# Altium PCB SydorenkoG12.PcbDoc
Units mil, origin at the board's own origin, x right, y up, seen from the top; angles counter-clockwise.
Board outline 4330.71 x 5511.81 mil, 2 copper layers (Top Layer, Bottom Layer); 73 components, 52 nets, 192 pads, 89 vias.
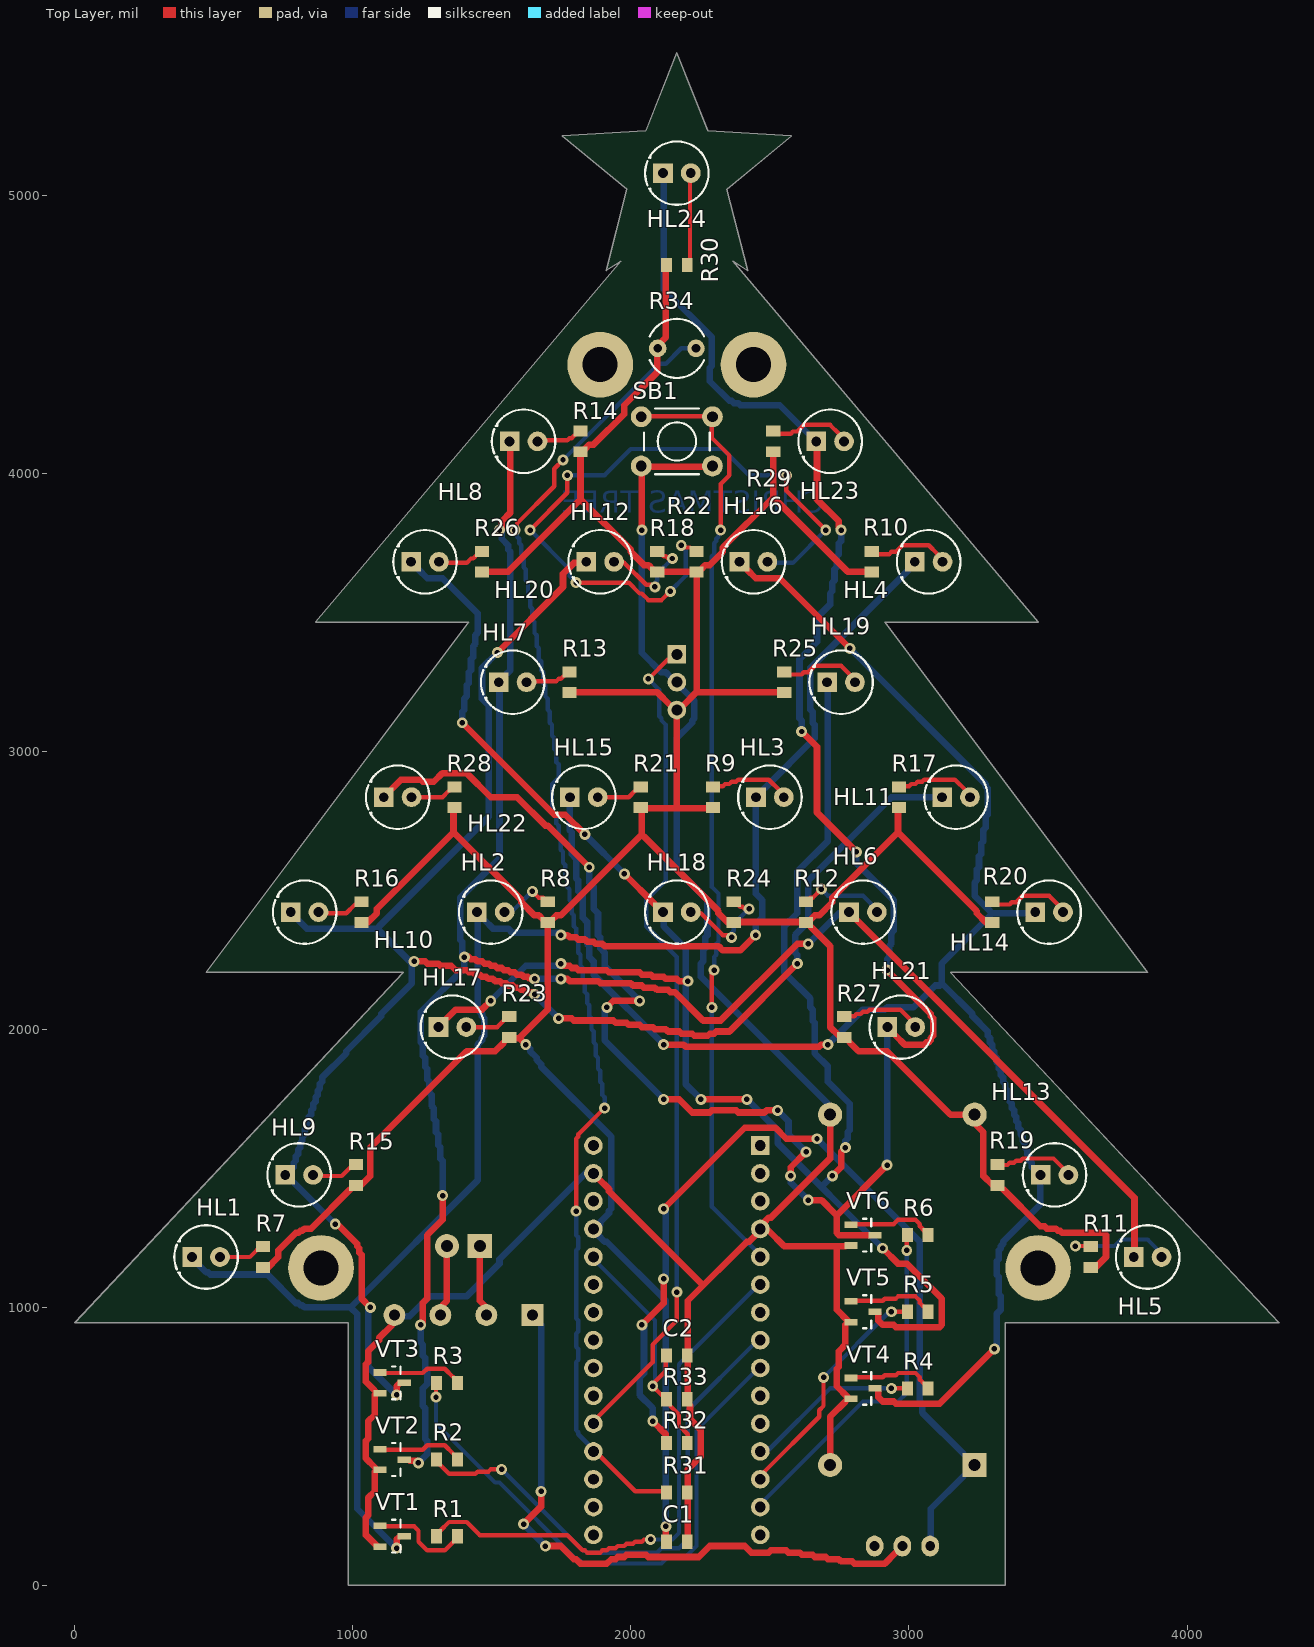
[diagram p0: Top Layer view]
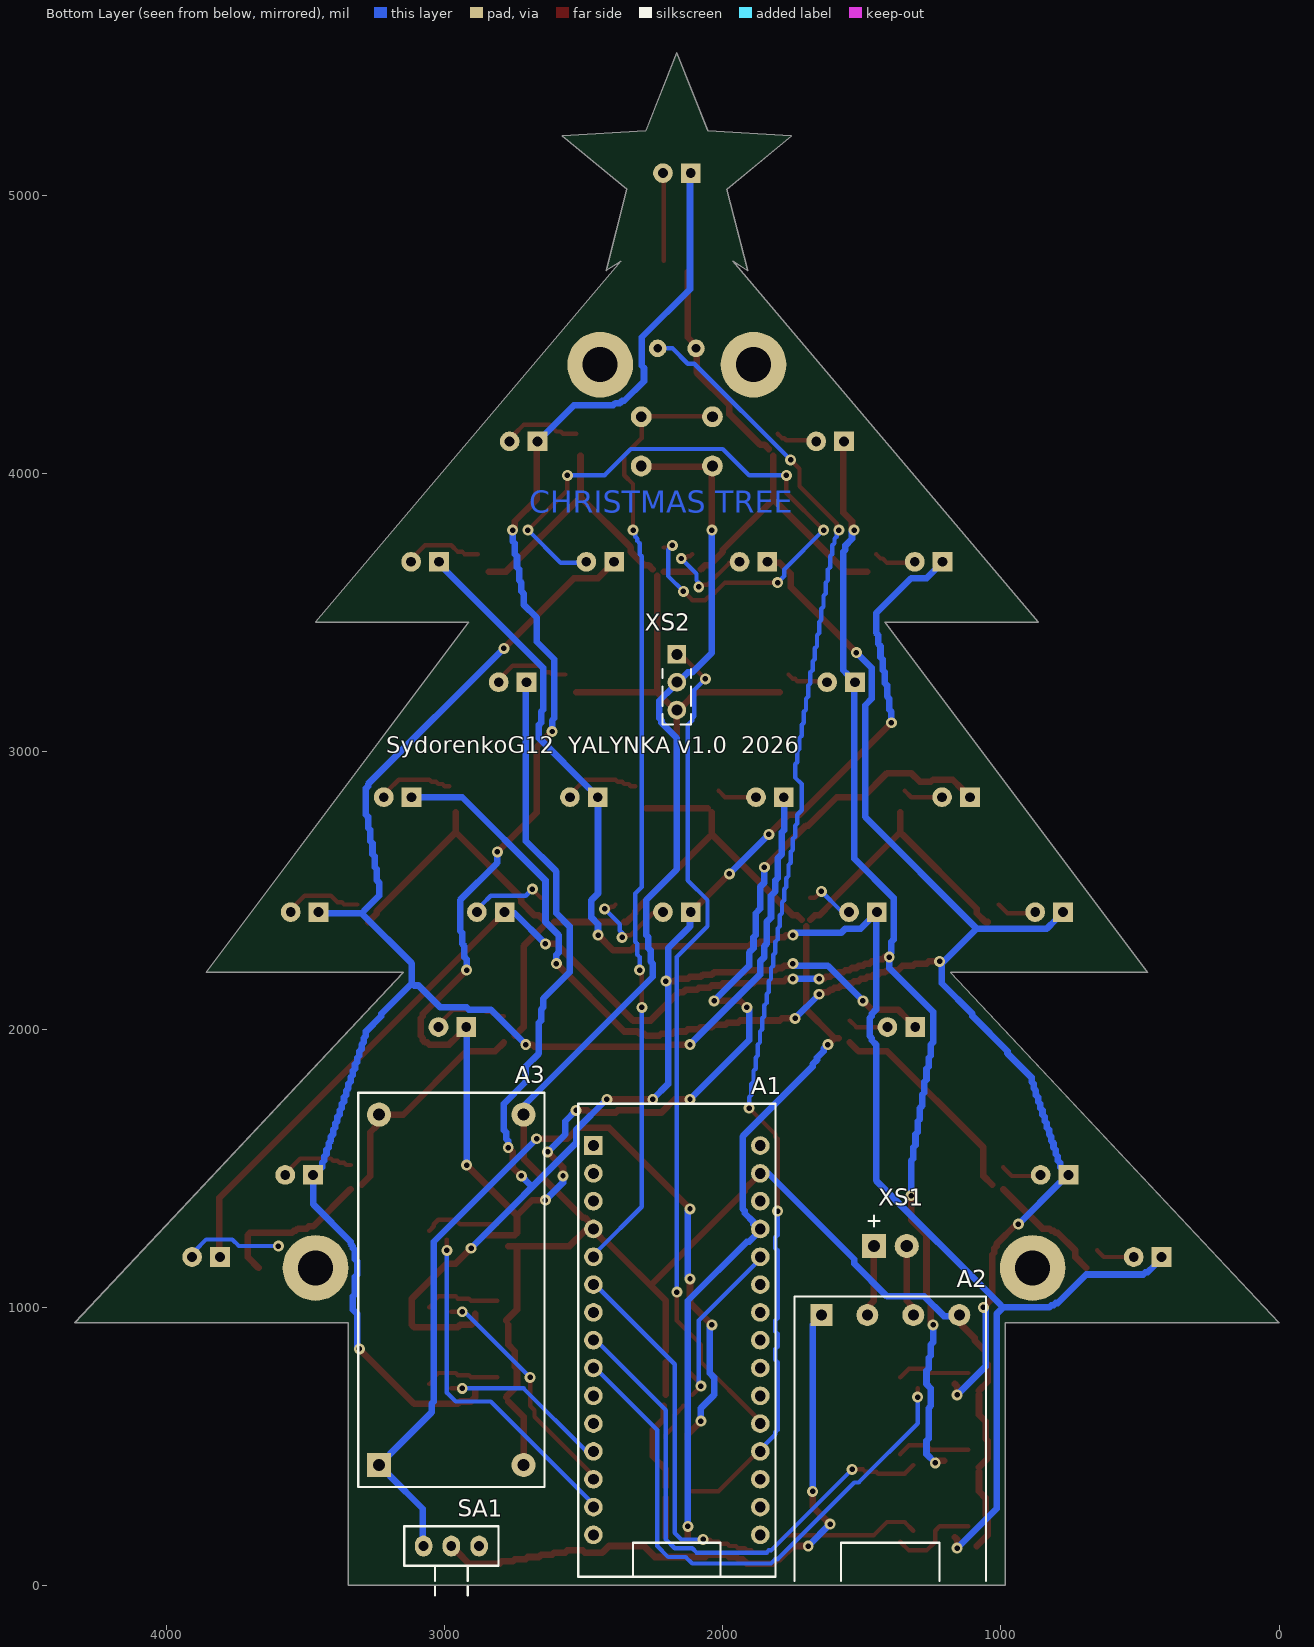
[diagram p1: Bottom Layer view, seen from below]

## Layer stack, top to bottom
Top Solder: solder mask 0.4, Solder Resist, Dk 3.5
Top Layer: signal copper 1.4
Dielectric 1: dielectric 12.6, FR-4, Dk 4.8
Bottom Layer: signal copper 1.4
Bottom Solder: solder mask 0.4, Solder Resist, Dk 3.5

## Board outline
0,944.88 984.25,944.88 984.25,0 3346.46,0 3346.46,944.88 4330.71,944.88 3149.61,2204.72 3858.27,2204.72 2913.39,3464.57 3464.57,3464.57 2366.57,4762.2 2419.92,4728.39 2345.08,5020.35 2577.24,5212.56 2276.42,5231.61 2165.35,5511.81 2054.29,5231.61 1753.46,5212.56 1985.63,5020.35 1910.79,4728.39 1964.13,4762.2 866.14,3464.57 1417.32,3464.57 472.44,2204.72 1181.1,2204.72

## Design rules (kind name [scope] priority, off if disabled: settings)
Clearance [All] p1: gap=10 ignorepadtopadclearanceinfootprint=FALSE
HoleSize [All] p1: absolutevalues=TRUE maxlimit=137.8 minlimit=0.98 maxpercent=80.000 minpercent=20.000
PolygonConnect [All] p1: connectstyle=Relief reliefconductorwidth=10 reliefentries=4 polygonreliefangle="90 Angle" airgapwidth=10
RoutingVias [All] p1: holewidth=19.68 width=39.37 viastyle="Through Hole" minholewidth=19.68 minwidth=39.37 maxholewidth=28 maxwidth=50
SolderMaskExpansion TentedVias [IsVia] p1: expansion=4 istentingtop=TRUE
SolderMaskExpansion [All] p2: expansion=4 istentingtop=FALSE
SupplyNets "Schematic Supply Nets_1" [InNet('+5V')] p1: voltage=0.000
SupplyNets "Schematic Supply Nets" [InNet('GND')] p2: voltage=0.000
Width [All] p1: maxlimit=40 minlimit=10 preferedwidth=16
29 further rules are at their usual default settings.

## Components (designator, comment, footprint, x,y, rotation, side; value= is the part's Value field where it differs from the comment)
A1 "Arduino Nano V3" ARDUINO_NANO 2165.35,881.89 r180 bottom
A2 "TP4056 Type-C" MOD_TP4056 1397.64,527.56 r180 bottom
A3 "MT3608 5V" MOD_MT3608 2976.38,1062.99 r180 bottom
C1 "10 мк" C_0805 2165.35,157.48 r0 top
C2 "100 н" C_0805 2165.35,826.77 r0 top
HL1 "LED 5mm" LED_5MM 472.44,1181.1 r0 top
HL2 "LED 5mm" LED_5MM 1496.06,2421.26 r0 top
HL3 "LED 5mm" LED_5MM 2500,2834.65 r0 top
HL4 "LED 5mm" LED_5MM 3070.87,3681.1 r0 top
HL5 "LED 5mm" LED_5MM 3858.27,1181.1 r0 top
HL6 "LED 5mm" LED_5MM 2834.65,2421.26 r0 top
HL7 "LED 5mm" LED_5MM 1574.8,3248.03 r0 top
HL8 "LED 5mm" LED_5MM 1614.17,4114.17 r0 top
HL9 "LED 5mm" LED_5MM 807.09,1476.38 r0 top
HL10 "LED 5mm" LED_5MM 826.77,2421.26 r0 top
HL11 "LED 5mm" LED_5MM 3169.29,2834.65 r0 top
HL12 "LED 5mm" LED_5MM 1889.76,3681.1 r0 top
HL13 "LED 5mm" LED_5MM 3523.62,1476.38 r0 top
HL14 "LED 5mm" LED_5MM 3503.94,2421.26 r0 top
HL15 "LED 5mm" LED_5MM 1830.71,2834.65 r0 top
HL16 "LED 5mm" LED_5MM 2440.94,3681.1 r0 top
HL17 "LED 5mm" LED_5MM 1358.27,2007.87 r0 top
HL18 "LED 5mm" LED_5MM 2165.35,2421.26 r0 top
HL19 "LED 5mm" LED_5MM 2755.91,3248.03 r0 top
HL20 "LED 5mm" LED_5MM 1259.84,3681.1 r0 top
HL21 "LED 5mm" LED_5MM 2972.44,2007.87 r0 top
HL22 "LED 5mm" LED_5MM 1161.42,2834.65 r0 top
HL23 "LED 5mm" LED_5MM 2716.54,4114.17 r0 top
HL24 "LED 5mm" LED_5MM 2165.35,5078.74 r0 top
R1 "1 к" R_0805 1338.58,177.17 r0 top
R2 "1 к" R_0805 1338.58,452.76 r0 top
R3 "1 к" R_0805 1338.58,728.35 r0 top
R4 "1 к" R_0805 3031.5,708.66 r0 top
R5 "1 к" R_0805 3031.5,984.25 r0 top
R6 "1 к" R_0805 3031.5,1259.84 r0 top
R7 "270" R_0805 677.17,1181.1 r90 top
R8 "270" R_0805 1700.79,2421.26 r90 top
R9 "270" R_0805 2295.28,2834.65 r90 top
R10 "270" R_0805 2866.14,3681.1 r90 top
R11 "270" R_0805 3653.54,1181.1 r90 top
R12 "270" R_0805 2629.92,2421.26 r90 top
R13 "270" R_0805 1779.53,3248.03 r90 top
R14 "270" R_0805 1818.9,4114.17 r90 top
R15 "180" R_0805 1011.81,1476.38 r90 top
R16 "180" R_0805 1031.5,2421.26 r90 top
R17 "180" R_0805 2964.57,2834.65 r90 top
R18 "180" R_0805 2094.49,3681.1 r90 top
R19 "180" R_0805 3318.9,1476.38 r90 top
R20 "180" R_0805 3299.21,2421.26 r90 top
R21 "180" R_0805 2035.43,2834.65 r90 top
R22 "180" R_0805 2236.22,3681.1 r90 top
R23 "180" R_0805 1562.99,2007.87 r90 top
R24 "180" R_0805 2370.08,2421.26 r90 top
R25 "180" R_0805 2551.18,3248.03 r90 top
R26 "180" R_0805 1464.57,3681.1 r90 top
R27 "180" R_0805 2767.72,2007.87 r90 top
R28 "180" R_0805 1366.14,2834.65 r90 top
R29 "180" R_0805 2511.81,4114.17 r90 top
R30 "180" R_0805 2165.35,4748.03 r0 top
R31 "10 к" R_0805 2165.35,334.65 r0 top
R32 "100 к" R_0805 2165.35,511.81 r0 top
R33 "100 к" R_0805 2165.35,669.29 r0 top
R34 "GL5528" LDR_5MM 2165.35,4448.82 r0 top
SA1 "SS12D00" SW_SLIDE_SPDT 2976.38,141.73 r180 bottom
SB1 "TS-6x6" TACT_6X6 2165.35,4114.17 r0 top
VT1 "BC817" SOT-23 1141.73,177.17 r270 top
VT2 "BC817" SOT-23 1141.73,452.76 r270 top
VT3 "BC817" SOT-23 1141.73,728.35 r270 top
VT4 "BC817" SOT-23 2834.65,708.66 r270 top
VT5 "BC817" SOT-23 2834.65,984.25 r270 top
VT6 "BC817" SOT-23 2834.65,1259.84 r270 top
XS1 "Li-ion 18650" BAT_PADS_2 1397.64,1220.47 r180 bottom
XS2 "MAX4466 / KY-038" PINHDR_1X3 2165.35,3248.03 r180 bottom

## Footprints (in the part's own frame and the unit in brackets; to place one, negate y for a bottom-side part, rotate by r counter-clockwise, add the part's x,y. Pads: shape width x height; smd on the part's side, far side on the other; paste and mask are expansions set on the pad)
ARDUINO_NANO [mm] "Arduino Nano V3 module, 2x15 THT 2.54mm, rows 15.24mm, USB at -Y"
  rect 1.7x1.7 hole 1: 1(-7.62,17.78)
  round 1.7 hole 1: 2(-7.62,15.24) 3(-7.62,12.7) 4(-7.62,10.16) 5(-7.62,7.62) 6(-7.62,5.08) 7(-7.62,2.54) 8(-7.62,0) 9(-7.62,-2.54) 10(-7.62,-5.08) 11(-7.62,-7.62) 12(-7.62,-10.16) 13(-7.62,-12.7) 14(-7.62,-15.24) 15(-7.62,-17.78) 16(7.62,-17.78) 17(7.62,-15.24) 18(7.62,-12.7) 19(7.62,-10.16) 20(7.62,-7.62) 21(7.62,-5.08) 22(7.62,-2.54) 23(7.62,0) 24(7.62,2.54) 25(7.62,5.08) 26(7.62,7.62) 27(7.62,10.16) 28(7.62,12.7) 29(7.62,15.24) 30(7.62,17.78)
  silkscreen extent -9,-21.6 9,21.6
BAT_PADS_2 [mm] "2 pads for battery wires, pad 1 = +"
  rect 2.2x2.2 hole 1.1: 1(-1.5,0)
  round 2.2 hole 1.1: 2(1.5,0)
  silkscreen extent -2,1.8 -1,2.8
C_0805 [mm] "Capacitor 0805 SMD"
  rect 1x1.3 smd: 1(-0.95,0) 2(0.95,0)
LDR_5MM [mm] "Photoresistor GL5528, 5mm"
  round 1.6 hole 0.8: 1(-1.75,0) 2(1.75,0)
  silkscreen extent -2.47,-2.7 2.47,2.7
LED_5MM [mm] "LED 5mm THT, pad 1 = K (square), pad 2 = A"
  rect 1.8x1.8 hole 0.9: 1(-1.27,0)
  round 1.8 hole 0.9: 2(1.27,0)
  silkscreen extent -2.9,-2.9 2.9,2.9
MOD_MT3608 [mm] "MT3608 boost module. 1=IN+ 2=IN- 3=OUT+ 4=OUT-"
  rect 2.2x2.2 hole 1.1: 1(-6.6,-16)
  round 2.2 hole 1.1: 2(6.6,-16) 3(-6.6,16) 4(6.6,16)
  silkscreen extent -8.5,-18 8.5,18
MOD_TP4056 [mm] "TP4056 Type-C charger module w/ protection. 1=OUT+ 2=B+ 3=B- 4=OUT-, USB at -Y"
  rect 2x2 hole 1: 1(-6.3,11.3)
  round 2 hole 1: 2(-2.1,11.3) 3(2.1,11.3) 4(6.3,11.3)
  silkscreen extent -8.75,-13 8.75,13
PINHDR_1X3 [mm] "Pin header 1x3 2.54mm"
  rect 1.7x1.7 hole 1: 1(0,2.54)
  round 1.7 hole 1: 2(0,0) 3(0,-2.54)
  silkscreen extent -1.3,-3.85 1.3,1.18
R_0805 [mm] "Resistor 0805 SMD"
  rect 1x1.3 smd: 1(-0.95,0) 2(0.95,0)
SOT-23 [mm] "SOT-23, 1=B 2=E 3=C (BC817)"
  rect 0.6x1.2 smd: 1(-0.95,-1.1) 2(0.95,-1.1) 3(0,1.1)
  silkscreen extent -1.5,0.01 1.5,0.75
SW_SLIDE_SPDT [mm] "Slide switch SPDT (SS12D00 type), 2.54mm, lever to -Y"
  oval 1.6x1.9 hole 0.9: 1(-2.54,0) 2(0,0) 3(2.54,0)
  silkscreen extent -4.3,-4.5 4.3,1.8
TACT_6X6 [mm] "Tactile switch 6x6 THT"
  round 1.9 hole 1: 1(-3.25,2.25) 1(3.25,2.25) 2(-3.25,-2.25) 2(3.25,-2.25)
  silkscreen extent -3,-3 3,3

## Part data
A1: library part "Arduino Nano", "Модуль мікроконтролера Arduino Nano V3 (ATmega328P, 16 МГц)"
A2: library part "TP4056 module", "Модуль заряду Li-ion TP4056 з USB Type-C та захистом DW01"
A3: library part "MT3608 module", "Підвищувальний DC-DC модуль MT3608, вихід налаштувати на 5,0 В"
C1: library part C_0805, "Конденсатор 0805 10 мкФ 16 В X5R"
C2: library part C_0805, "Конденсатор 0805 100 нФ 50 В X7R"
HL1 HL2 HL3 HL4: library part LED, "Світлодіод 5 мм, червоний"
HL5 HL6 HL7 HL8: library part LED, "Світлодіод 5 мм, жовтий"
HL9 HL10 HL11 HL12: library part LED, "Світлодіод 5 мм, зелений"
HL13 HL14 HL15 HL16: library part LED, "Світлодіод 5 мм, синій"
HL17 HL18 HL19 HL20: library part LED, "Світлодіод 5 мм, білий"
HL21 HL22 HL23 HL24: library part LED, "Світлодіод 5 мм, теплий білий"
R1 R2 R3 R4 R5 R6: library part R_0805, "Резистор 0805 1 кОм 5%"
R7 R8 R9 R10 R11 R12 R13 R14: library part R_0805, "Резистор 0805 270 Ом 5%"
R15 R16 R17 R18 R19 R20 R21 R22 R23 R24 R25 R26 R27 R28 R29 R30: library part R_0805, "Резистор 0805 180 Ом 5%"
R31: library part R_0805, "Резистор 0805 10 кОм 5%"
R32 R33: library part R_0805, "Резистор 0805 100 кОм 1%"
R34: library part Photoresistor, "Фоторезистор GL5528"
SA1: library part "Switch SPDT", "Перемикач живлення SS12D00"
SB1: library part Button, "Кнопка тактова 6x6 мм (режими)"
VT1 VT2 VT3 VT4 VT5 VT6: library part "VT npn SOT23", "Транзистор NPN BC817-40, SOT-23"
XS1: library part "Battery pads", "Контакти для акумулятора 18650 (тримач на дротах)"
XS2: library part "Mic header", "Роз'єм модуля мікрофона (OUT, GND, VCC)"

## Free pads (board coordinates)
  round 236.22 hole 125.98: MH(885.83,1141.73) MH(1889.76,4389.76) MH(2440.94,4389.76) MH(3464.57,1141.73)

## Via types
v1: diameter 39.37, hole 19.68, Top Layer to Bottom Layer, tented both sides, 89 vias

## Nets (pads, with @x,y where several pads share a name; then routed paths per layer and width w, separated by ;. In a path a pad name is that pad's centre, name@x,y a point inside that pad or via, vN(x,y) a via of type N, cw(c..) or ccw(c..) an arc to the next point about the centre after c; other vN are vias at no path point)
+5V: A1.27 A3.3 C1.1 R7.1 R8.1 R9.1 R10.1 R11.1 R12.1 R13.1 R14.1 R15.1 R16.1 R17.1 R18.1 R19.1 R20.1 R21.1 R22.1 R23.1 R24.1 R25.1 R26.1 R27.1 R28.1 R29.1 R30.1 R34.1 XS2.3 | length 12974.2
  Top Layer w23.62: R7.1@692.91,1141.73 732.28,1181.1 732.28,1204.72 795.28,1267.72 803.15,1267.72 811.02,1275.59 818.9,1275.59 826.77,1283.46 850.39,1283.46 R15.1@992.13,1425.2 ; R15.1@1031.5,1440.94 1062.99,1472.44 1062.99,1574.8 1409.45,1921.26 1511.81,1921.26 R23.1@1543.31,1952.76 ; R16.1@1047.24,2385.83 1055.12,2385.83 1086.61,2417.32 1086.61,2433.07 1354.33,2700.79 ; R28.1@1362.2,2779.53 1362.2,2708.66 1606.3,2464.57 1606.3,2456.69 1653.54,2409.45 1669.29,2409.45 R8.1@1685.04,2393.7 ; R26.1@1480.32,3645.67 1559.06,3645.67 1811.02,3897.64 ; R23.1@1582.68,1968.5 1598.43,1968.5 v1(1622.05,1944.88) ; 1606.3,1976.38 1700.79,2070.87 R8.1@1700.79,2370.08 ; R8.1@1716.54,2393.7 1732.28,2409.45 1748.03,2409.45 2039.37,2700.79 R21.1@2039.37,2779.53 ; R13.1@1795.28,3212.6 2094.49,3212.6 XS2.3@2141.73,3165.35 ; R14.1@1818.9,4062.99 1818.9,3905.51 2000,3724.41 2000,3716.54 2047.24,3669.29 2062.99,3669.29 R18.1@2078.74,3653.54 ; R14.1@1834.65,4086.61 1850.39,4102.36 1866.14,4102.36 1976.38,4212.6 1976.38,4244.09 2094.49,4362.2 R34.1@2094.49,4425.2 ; 2047.24,2692.91 2314.96,2425.2 2314.96,2417.32 2346.46,2385.83 R24.1@2354.33,2385.83 ; R21.1@2055.12,2795.28 R9.1@2275.59,2795.28 ; R18.1@2110.24,3645.67 R22.1@2212.6,3645.67 ; R34.1@2110.24,4472.44 2125.98,4488.19 R30.1@2125.98,4724.41 ; C1.1@2125.98,173.23 v1(2125.98,212.6) ; 2165.35,2803.15 XS2.3@2165.35,3118.11 ; XS2.3@2188.98,3165.35 2236.22,3212.6 R25.1@2527.56,3212.6 ; 2236.22,3220.47 R22.1@2236.22,3629.92 ; R22.1@2251.97,3653.54 2267.72,3669.29 2283.46,3669.29 2330.71,3716.54 2330.71,3732.28 2511.81,3913.39 R29.1@2511.81,4062.99 ; R24.1@2385.83,2385.83 R12.1@2606.3,2385.83 ; 2519.68,3905.51 2779.53,3645.67 R10.1@2842.52,3645.67 ; R12.1@2645.67,2370.08 2716.54,2299.21 2716.54,2007.87 R27.1@2748.03,1976.38 ; R12.1@2645.67,2393.7 2661.42,2409.45 2677.17,2409.45 2724.41,2456.69 2724.41,2472.44 2960.63,2708.66 R17.1@2960.63,2779.53 ; R27.1@2787.4,1952.76 2818.9,1921.26 2921.26,1921.26 3149.61,1692.91 A3.3@3196.85,1692.91 ; 2968.5,2700.79 3244.09,2425.2 3244.09,2417.32 R20.1@3275.59,2385.83 ; A3.3@3244.09,1653.54 3267.72,1629.92 3267.72,1472.44 R19.1@3299.21,1440.94 ; R19.1@3338.58,1425.2 3472.44,1291.34 3488.19,1291.34 3496.06,1283.46 3527.56,1283.46 3535.43,1275.59 3543.31,1275.59 3551.18,1267.72 3700.79,1267.72 3708.66,1259.84 3708.66,1181.1 R11.1@3669.29,1141.73
  Bottom Layer w23.62: v1(1622.05,1944.88) 1637.8,1929.13 1637.8,1921.26 1661.42,1897.64 1661.42,1889.76 1677.17,1874.02 1677.17,1866.14 1929.13,1614.17 1929.13,1354.33 1921.26,1346.46 1921.26,1338.58 1889.76,1307.09 A1.27@1889.76,1299.21 ; A1.27@1881.89,1259.84 1905.51,1236.22 1913.39,1236.22 2125.98,1023.62 v1(2125.98,212.6)
BAT+: A2.2 XS1.1 | length 179.8
  Top Layer w23.62: XS1.1@1456.69,1181.1 1456.69,1023.62 A2.2@1472.44,1007.87
BAT-: A2.3 XS1.2 | length 179.8
  Top Layer w23.62: A2.3@1322.83,1007.87 1338.58,1023.62 XS1.2@1338.58,1181.1
BTN: A1.5 SB1.1 | length 3294.5
  Top Layer w15.75: SB1.1@2070.87,4204.72 SB1.1@2259.84,4204.72 ; v1(2291.34,2078.74) 2291.34,2204.72 v1(2299.21,2212.6) ; SB1.1@2291.34,4173.23 2291.34,4125.98 2354.33,4062.99 2354.33,3992.13 2322.83,3960.63 v1(2322.83,3795.28)
  Bottom Layer w15.75: v1(2291.34,2078.74) 2291.34,1362.2 A1.5@2448.82,1204.72 ; v1(2299.21,2212.6) 2299.21,2259.84 2307.09,2267.72 2307.09,2307.09 2314.96,2314.96 2314.96,2488.19 2291.34,2511.81 2291.34,3700.79 2299.21,3708.66 2299.21,3748.03 2307.09,3755.91 2307.09,3763.78 2314.96,3771.65 2314.96,3779.53 2322.83,3787.4 v1(2322.83,3795.28)
GND: A1.4 A1.29 A2.4 A3.2 A3.4 C1.2 C2.2 R31.2 R33.2 SB1.2 VT1.2 VT2.2 VT3.2 VT4.2 VT5.2 VT6.2 XS2.2 | length 7663.4
  Top Layer w23.62: VT2.2@1078.74,409.45 1078.74,338.58 1055.12,314.96 1055.12,251.97 1047.24,244.09 1047.24,181.1 VT1.2@1086.61,141.73 ; VT2.2@1078.74,425.2 1047.24,456.69 1047.24,519.68 1055.12,527.56 1055.12,590.55 1078.74,614.17 VT3.2@1078.74,685.04 ; VT3.2@1078.74,700.79 1047.24,732.28 1047.24,795.28 1055.12,803.15 1055.12,842.52 1094.49,881.89 1094.49,889.76 A2.4@1141.73,937.01 ; A1.29@1881.89,1464.57 1921.26,1425.2 1921.26,1417.32 2251.97,1086.61 ; v1(2039.37,3795.28) SB1.2@2039.37,3992.13 ; SB1.2@2070.87,4023.62 SB1.2@2259.84,4023.62 ; C1.2@2204.72,173.23 R31.2@2204.72,314.96 ; R31.2@2204.72,354.33 2204.72,417.32 2251.97,464.57 2251.97,559.06 2212.6,598.43 R33.2@2212.6,645.67 ; R33.2@2204.72,685.04 C2.2@2204.72,803.15 ; C2.2@2204.72,842.52 2204.72,1023.62 2417.32,1236.22 2425.2,1236.22 A1.4@2448.82,1259.84 ; A1.4@2480.32,1307.09 2496.06,1322.83 2503.94,1322.83 2716.54,1535.43 A3.4@2716.54,1653.54 ; A1.4@2496.06,1275.59 2551.18,1220.47 VT6.2@2771.65,1220.47 ; A3.2@2716.54,472.44 2716.54,606.3 VT4.2@2771.65,661.42 ; 2740.16,1212.6 2740.16,992.13 VT5.2@2779.53,952.76 ; VT5.2@2771.65,937.01 2771.65,866.14 2748.03,842.52 2748.03,787.4 2740.16,779.53 2740.16,716.54 VT4.2@2779.53,677.17
  Bottom Layer w23.62: A2.4@1181.1,968.5 1204.72,968.5 1275.59,1039.37 1409.45,1039.37 1527.56,1157.48 1527.56,1173.23 A1.29@1834.65,1480.32 ; v1(2039.37,3795.28) 2039.37,3354.33 2110.24,3283.46 2125.98,3283.46 XS2.2@2141.73,3267.72 ; XS2.2@2181.1,3228.35 2228.35,3181.1 2228.35,3118.11 2220.47,3110.24 2220.47,3102.36 2165.35,3047.24 2165.35,2574.8 2275.59,2464.57 2275.59,2338.58 2267.72,2330.71 2267.72,2291.34 2259.84,2283.46 2259.84,2244.09 2251.97,2236.22 2251.97,2188.98 A3.4@2708.66,1732.28
LIGHT: A1.19 R31.1 R34.2 | length 4737.7
  Top Layer w15.75: v1(1582.68,3795.28) 1590.55,3803.15 1590.55,3818.9 1724.41,3952.76 1724.41,4015.75 v1(1755.91,4047.24) ; v1(1803.15,1346.46) 1803.15,1606.3 1811.02,1614.17 1811.02,1622.05 v1(1905.51,1716.54) ; A1.19@1889.76,464.57 2015.75,338.58 R31.1@2110.24,338.58
  Bottom Layer w15.75: v1(1582.68,3795.28) 1590.55,3787.4 1590.55,3771.65 1598.43,3763.78 1598.43,3748.03 1606.3,3740.16 1606.3,3708.66 1614.17,3700.79 1614.17,3661.42 1622.05,3653.54 1622.05,3614.17 1629.92,3606.3 1629.92,3566.93 1637.8,3559.06 1637.8,3519.68 1645.67,3511.81 1645.67,3472.44 1653.54,3464.57 1653.54,3425.2 1661.42,3417.32 1661.42,3377.95 1669.29,3370.08 1669.29,3330.71 1677.17,3322.83 1677.17,3291.34 1685.04,3283.46 1685.04,3244.09 1692.91,3236.22 1692.91,3196.85 1700.79,3188.98 1700.79,3149.61 1708.66,3141.73 1708.66,3102.36 1716.54,3094.49 1716.54,3055.12 1724.41,3047.24 1724.41,3007.87 1732.28,3000 1732.28,2960.63 1740.16,2952.76 1740.16,2905.51 1716.54,2881.89 1716.54,2787.4 1732.28,2771.65 1732.28,2740.16 1740.16,2732.28 1740.16,2692.91 1748.03,2685.04 1748.03,2645.67 1755.91,2637.8 1755.91,2598.43 1763.78,2590.55 1763.78,2551.18 1771.65,2543.31 1771.65,2511.81 1779.53,2503.94 1779.53,2464.57 1787.4,2456.69 1787.4,2417.32 1795.28,2409.45 1795.28,2370.08 1803.15,2362.2 1803.15,2322.83 1811.02,2314.96 1811.02,2275.59 1818.9,2267.72 1818.9,2228.35 1826.77,2220.47 1826.77,2181.1 1834.65,2173.23 1834.65,2133.86 1842.52,2125.98 1842.52,2094.49 1850.39,2086.61 1850.39,2047.24 1858.27,2039.37 1858.27,2000 1866.14,1992.13 1866.14,1952.76 1874.02,1944.88 1874.02,1905.51 1881.89,1897.64 1881.89,1858.27 1889.76,1850.39 1889.76,1811.02 1897.64,1803.15 1897.64,1763.78 1905.51,1755.91 v1(1905.51,1716.54) ; v1(1755.91,4047.24) 2102.36,4393.7 2125.98,4393.7 2181.1,4448.82 R34.2@2204.72,4448.82 ; v1(1803.15,1346.46) 1803.15,1259.84 1811.02,1251.97 1811.02,1212.6 1803.15,1204.72 1803.15,960.63 1811.02,952.76 1811.02,913.39 1803.15,905.51 1803.15,858.27 1811.02,850.39 1811.02,811.02 1803.15,803.15 1803.15,559.06 1811.02,551.18 1811.02,543.31 A1.19@1850.39,503.94
MIC: A1.20 XS2.1 | length 2972.3
  Top Layer w15.75: A1.20@1881.89,606.3 2078.74,803.15 2078.74,866.14 2165.35,952.76 v1(2165.35,1055.12) ; v1(2062.99,3259.84) XS2.1@2133.86,3330.71
  Bottom Layer w15.75: v1(2062.99,3259.84) 2102.36,3220.47 2102.36,3125.98 2110.24,3118.11 2110.24,3110.24 2125.98,3094.49 2125.98,2535.43 2055.12,2464.57 2055.12,2370.08 2165.35,2259.84 v1(2165.35,1055.12)
NetHL1_1: HL1.1 HL2.1 HL3.1 HL4.1 VT1.3 | length 5718.6
  Top Layer w23.62: v1(1157.48,133.86) 1157.48,165.35 VT1.3@1165.35,173.23 ; v1(1748.03,2338.58) 1771.65,2338.58 1779.53,2330.71 1803.15,2330.71 1811.02,2322.83 1834.65,2322.83 1842.52,2314.96 1866.14,2314.96 1874.02,2307.09 1897.64,2307.09 1905.51,2299.21 2314.96,2299.21 2330.71,2283.46 2393.7,2283.46 v1(2448.82,2338.58)
  Bottom Layer w23.62: HL1.1@448.82,1149.61 472.44,1125.98 480.31,1125.98 488.19,1118.11 692.91,1118.11 795.28,1015.75 803.15,1015.75 811.02,1007.87 818.9,1007.87 826.77,1000 992.13,1000 1015.75,976.38 1015.75,275.59 v1(1157.48,133.86) ; 1000,1007.87 1448.82,1456.69 1448.82,1944.88 1464.57,1960.63 1464.57,1968.5 1472.44,1976.38 1472.44,2039.37 1464.57,2047.24 1464.57,2055.12 1448.82,2070.87 HL2.1@1448.82,2393.7 ; HL2.1@1472.44,2393.7 1503.94,2362.2 1559.06,2362.2 1574.8,2346.46 1740.16,2346.46 v1(1748.03,2338.58) ; v1(2448.82,2338.58) 2448.82,2377.95 2472.44,2401.57 2472.44,2464.57 2448.82,2488.19 HL3.1@2448.82,2803.15 ; HL3.1@2480.32,2866.14 2661.42,3047.24 2661.42,3094.49 2653.54,3102.36 2653.54,3141.73 2645.67,3149.61 2645.67,3299.21 HL4.1@3000,3653.54
NetHL1_2: HL1.2 R7.2 | length 112.1
  Top Layer w15.75: HL1.2@551.18,1181.1 629.92,1181.1 R7.2@653.54,1204.72
NetHL2_2: HL2.2 R8.2 | length 149.4
  Top Layer w15.75: v1(1645.67,2496.06) 1669.29,2472.44 R8.2@1685.04,2472.44
  Bottom Layer w15.75: HL2.2@1574.8,2425.2 v1(1645.67,2496.06)
NetHL3_2: HL3.2 R9.2 | length 246.6
  Top Layer w15.75: R9.2@2314.96,2874.02 2330.71,2874.02 2338.58,2881.89 2354.33,2881.89 2362.2,2889.76 2377.95,2889.76 2385.83,2897.64 2496.06,2897.64 HL3.2@2535.43,2858.27
NetHL4_2: HL4.2 R10.2 | length 246.6
  Top Layer w15.75: R10.2@2881.89,3708.66 2929.13,3708.66 2937.01,3716.54 2952.76,3716.54 2976.38,3740.16 3070.87,3740.16 HL4.2@3102.36,3708.66
NetHL5_1: HL5.1 HL6.1 HL7.1 HL8.1 VT2.3 | length 7100.1
  Top Layer w23.62: VT2.3@1204.72,448.82 1228.35,448.82 v1(1236.22,440.94) ; v1(1244.09,937.01) 1251.97,944.88 1251.97,1015.75 1267.72,1031.5 1267.72,1259.84 1322.83,1314.96 v1(1322.83,1401.57) ; v1(1401.57,2259.84) 1417.32,2259.84 1425.2,2251.97 1440.94,2251.97 1448.82,2244.09 1464.57,2244.09 1472.44,2236.22 1488.19,2236.22 1496.06,2228.35 1511.81,2228.35 1519.68,2220.47 1535.43,2220.47 1543.31,2212.6 1559.06,2212.6 1566.93,2204.72 1582.68,2204.72 1590.55,2196.85 1606.3,2196.85 1614.17,2188.98 1629.92,2188.98 1637.8,2181.1 v1(1653.54,2181.1) ; v1(1527.56,3795.28) 1535.43,3803.15 1535.43,3826.77 1566.93,3858.27 HL8.1@1566.93,4086.61 ; v1(1748.03,2181.1) 1771.65,2181.1 1779.53,2173.23 1881.89,2173.23 1889.76,2165.35 2000,2165.35 2007.87,2157.48 2039.37,2157.48 2047.24,2149.61 2086.61,2149.61 2094.49,2141.73 2133.86,2141.73 2141.73,2133.86 2157.48,2133.86 2259.84,2031.5 2322.83,2031.5 2598.43,2307.09 v1(2637.8,2307.09) ; HL6.1@2811.02,2393.7 3811.02,1393.7 HL5.1@3811.02,1212.6
  Bottom Layer w23.62: v1(1236.22,440.94) 1267.72,472.44 1267.72,519.68 1259.84,527.56 1259.84,637.8 1251.97,645.67 1251.97,708.66 1267.72,724.41 1267.72,771.65 1259.84,779.53 1259.84,818.9 1251.97,826.77 1251.97,866.14 1244.09,874.02 v1(1244.09,937.01) ; v1(1322.83,1401.57) 1322.83,1527.56 1314.96,1535.43 1314.96,1574.8 1307.09,1582.68 1307.09,1622.05 1299.21,1629.92 1299.21,1669.29 1291.34,1677.17 1291.34,1716.54 1283.46,1724.41 1283.46,1763.78 1275.59,1771.65 1275.59,1811.02 1267.72,1818.9 1267.72,1858.27 1259.84,1866.14 1259.84,1897.64 1251.97,1905.51 1251.97,1944.88 1244.09,1952.76 1244.09,2062.99 1401.57,2220.47 1401.57,2267.72 1393.7,2275.59 1393.7,2314.96 1385.83,2322.83 1385.83,2472.44 1527.56,2614.17 HL7.1@1527.56,3220.47 ; v1(1527.56,3795.28) 1535.43,3787.4 1535.43,3763.78 1559.06,3740.16 1559.06,3724.41 1566.93,3716.54 1566.93,3291.34 HL7.1@1551.18,3275.59 ; v1(1653.54,2181.1) v1(1748.03,2181.1) ; v1(2637.8,2307.09) 2748.03,2417.32 HL6.1@2755.91,2417.32
NetHL5_2: HL5.2 R11.2 | length 356.8
  Top Layer w15.75: v1(3598.43,1220.47) R11.2@3629.92,1220.47
  Bottom Layer w15.75: v1(3598.43,1220.47) 3740.16,1220.47 3763.78,1244.09 3858.27,1244.09 HL5.2@3897.64,1204.72
NetHL6_2: HL6.2 R12.2 | length 256.3
  Top Layer w15.75: R12.2@2645.67,2472.44 2653.54,2472.44 v1(2685.04,2503.94)
  Bottom Layer w15.75: v1(2685.04,2503.94) 2708.66,2480.32 2834.65,2480.32 HL6.2@2866.14,2448.82
NetHL7_2: HL7.2 R13.2 | length 120
  Top Layer w15.75: HL7.2@1653.54,3251.97 1732.28,3251.97 1740.16,3259.84 1748.03,3259.84 R13.2@1763.78,3275.59
NetHL8_2: HL8.2 R14.2 | length 120
  Top Layer w15.75: HL8.2@1692.91,4118.11 1771.65,4118.11 1779.53,4125.98 1787.4,4125.98 R14.2@1803.15,4141.73
NetHL9_1: HL9.1 HL10.1 HL11.1 HL12.1 VT3.3 | length 6477.9
  Top Layer w23.62: v1(937.01,1299.21) 944.88,1299.21 1015.75,1228.35 1015.75,1220.47 1023.62,1212.6 1023.62,1196.85 1031.5,1188.98 1031.5,1031.5 v1(1062.99,1000) ; v1(1157.48,685.04) 1157.48,716.54 VT3.3@1165.35,724.41 ; v1(1220.47,2244.09) 1259.84,2244.09 1267.72,2236.22 1307.09,2236.22 1314.96,2228.35 1354.33,2228.35 1370.08,2212.6 1409.45,2212.6 1417.32,2204.72 1433.07,2204.72 1440.94,2196.85 1456.69,2196.85 1464.57,2188.98 1480.32,2188.98 1488.19,2181.1 1503.94,2181.1 1511.81,2173.23 1527.56,2173.23 1535.43,2165.35 1551.18,2165.35 1559.06,2157.48 1574.8,2157.48 1582.68,2149.61 1598.43,2149.61 1606.3,2141.73 1614.17,2141.73 1622.05,2133.86 1645.67,2133.86 v1(1653.54,2125.98) ; v1(1519.68,3354.33) 1755.91,3590.55 1755.91,3637.8 1795.28,3677.17 HL12.1@1811.02,3677.17 ; v1(1740.16,2039.37) 1787.4,2039.37 1795.28,2031.5 1937.01,2031.5 1944.88,2023.62 1984.25,2023.62 1992.13,2015.75 2031.5,2015.75 2039.37,2007.87 2078.74,2007.87 2086.61,2000 2125.98,2000 2133.86,1992.13 2173.23,1992.13 2181.1,1984.25 2220.47,1984.25 2228.35,1976.38 2275.59,1976.38 2283.46,1984.25 2299.21,1984.25 2307.09,1992.13 2354.33,1992.13 v1(2598.43,2236.22)
  Bottom Layer w23.62: HL9.1@787.4,1448.82 v1(937.01,1299.21) ; HL9.1@787.4,1503.94 787.4,1519.68 795.28,1527.56 795.28,1543.31 803.15,1551.18 803.15,1566.93 811.02,1574.8 811.02,1590.55 818.9,1598.43 818.9,1614.17 826.77,1622.05 826.77,1637.8 834.65,1645.67 834.65,1661.42 842.52,1669.29 842.52,1685.04 850.39,1692.91 850.39,1708.66 858.27,1716.54 858.27,1732.28 866.14,1740.16 866.14,1755.91 874.02,1763.78 874.02,1779.53 881.89,1787.4 881.89,1803.15 889.76,1811.02 889.76,1826.77 976.38,1913.39 976.38,1921.26 1102.36,2047.24 1102.36,2055.12 1212.6,2165.35 1212.6,2236.22 1086.61,2362.2 834.65,2362.2 HL10.1@803.15,2393.7 ; v1(1062.99,1000) 1055.12,992.13 1055.12,787.4 v1(1157.48,685.04) ; 1094.49,2370.08 1488.19,2763.78 1488.19,3165.35 1464.57,3188.98 1464.57,3299.21 v1(1519.68,3354.33) ; v1(1653.54,2125.98) v1(1740.16,2039.37) ; v1(2598.43,2236.22) 2598.43,2267.72 2590.55,2275.59 2590.55,2338.58 2637.8,2385.83 2637.8,2535.43 2937.01,2834.65 HL11.1@3086.61,2834.65
NetHL9_2: HL9.2 R15.2 | length 115.4
  Top Layer w15.75: HL9.2@889.76,1472.44 960.63,1472.44 R15.2@992.13,1503.94
NetHL10_2: HL10.2 R16.2 | length 115.4
  Top Layer w15.75: HL10.2@905.51,2417.32 976.38,2417.32 R16.2@1007.87,2448.82
NetHL11_2: HL11.2 R17.2 | length 246.6
  Top Layer w15.75: R17.2@2984.25,2874.02 3000,2874.02 3007.87,2881.89 3023.62,2881.89 3031.5,2889.76 3047.24,2889.76 3055.12,2897.64 3165.35,2897.64 HL11.2@3204.72,2858.27
NetHL12_2: HL12.2 R18.2 | length 328.3
  Top Layer w15.75: HL12.2@1968.5,3677.17 1976.38,3677.17 2055.12,3598.43 2078.74,3598.43 v1(2086.61,3590.55) ; R18.2@2110.24,3708.66 2118.11,3700.79 2125.98,3700.79 2133.86,3692.91 v1(2149.61,3692.91)
  Bottom Layer w15.75: v1(2086.61,3590.55) 2086.61,3606.3 2094.49,3614.17 2094.49,3637.8 v1(2149.61,3692.91)
NetHL13_1: HL13.1 HL14.1 HL15.1 HL16.1 VT4.3 | length 6225.8
  Top Layer w23.62: v1(2118.11,1944.88) 2188.98,1944.88 2196.85,1937.01 2677.17,1937.01 2685.04,1944.88 v1(2708.66,1944.88) ; HL16.1@2417.32,3653.54 2448.82,3622.05 2535.43,3622.05 v1(2787.4,3370.08) ; VT4.3@2889.76,700.79 2889.76,677.17 2905.51,661.42 2944.88,661.42 2952.76,653.54 3110.24,653.54 v1(3307.09,850.39)
  Bottom Layer w23.62: HL15.1@1779.53,2803.15 1779.53,2716.54 1787.4,2708.66 1787.4,2629.92 1803.15,2614.17 1803.15,2543.31 1811.02,2535.43 1811.02,2496.06 1826.77,2480.32 1826.77,2401.57 1842.52,2385.83 1842.52,2307.09 1850.39,2299.21 1850.39,2259.84 1866.14,2244.09 1866.14,2196.85 v1(2118.11,1944.88) ; v1(2708.66,1944.88) 2834.65,2070.87 2913.39,2070.87 2921.26,2078.74 3015.75,2078.74 3094.49,2157.48 3110.24,2157.48 ; v1(2787.4,3370.08) 3275.59,2881.89 3275.59,2874.02 3283.46,2866.14 3283.46,2771.65 3275.59,2763.78 3275.59,2724.41 3267.72,2716.54 3267.72,2677.17 3259.84,2669.29 3259.84,2629.92 3251.97,2622.05 3251.97,2582.68 3244.09,2574.8 3244.09,2535.43 3236.22,2527.56 3236.22,2480.32 3291.34,2425.2 ; v1(3307.09,850.39) 3314.96,858.27 3314.96,976.38 3330.71,992.13 3330.71,1039.37 3322.83,1047.24 3322.83,1110.24 3314.96,1118.11 3314.96,1165.35 3322.83,1173.23 3322.83,1204.72 3330.71,1212.6 3330.71,1220.47 3338.58,1228.35 3338.58,1236.22 3472.44,1370.08 HL13.1@3472.44,1448.82 ; HL14.1@3425.2,2417.32 3299.21,2417.32 3118.11,2236.22 3118.11,2165.35 3228.35,2055.12 3228.35,2047.24 3283.46,1992.13 3283.46,1976.38 3291.34,1968.5 3291.34,1952.76 3299.21,1944.88 3299.21,1929.13 3307.09,1921.26 3307.09,1905.51 3314.96,1897.64 3314.96,1881.89 3322.83,1874.02 3322.83,1858.27 3330.71,1850.39 3330.71,1834.65 3338.58,1826.77 3338.58,1811.02 3346.46,1803.15 3346.46,1787.4 3354.33,1779.53 3354.33,1763.78 3362.2,1755.91 3362.2,1740.16 3370.08,1732.28 3370.08,1716.54 3377.95,1708.66 3377.95,1692.91 3385.83,1685.04 3385.83,1669.29 3393.7,1661.42 3393.7,1645.67 3401.57,1637.8 3401.57,1622.05 3409.45,1614.17 3409.45,1598.43 3417.32,1590.55 3417.32,1574.8 3425.2,1566.93 3425.2,1551.18 3433.07,1543.31 3433.07,1527.56 3440.94,1519.68 HL13.1@3440.94,1503.94
NetHL13_2: HL13.2 R19.2 | length 246.6
  Top Layer w15.75: R19.2@3338.58,1511.81 3354.33,1511.81 3362.2,1519.68 3377.95,1519.68 3385.83,1527.56 3401.57,1527.56 3409.45,1535.43 3519.68,1535.43 HL13.2@3559.06,1496.06
NetHL14_2: HL14.2 R20.2 | length 246.6
  Top Layer w15.75: R20.2@3314.96,2448.82 3362.2,2448.82 3370.08,2456.69 3385.83,2456.69 3409.45,2480.32 3503.94,2480.32 HL14.2@3535.43,2448.82
NetHL15_2: HL15.2 R21.2 | length 112.1
  Top Layer w15.75: HL15.2@1913.39,2834.65 1992.13,2834.65 R21.2@2015.75,2858.27
NetHL16_2: HL16.2 R22.2 | length 2468.2
  Top Layer w15.75: v1(1637.8,3795.28) 1771.65,3929.13 v1(1771.65,3992.13) ; v1(1803.15,3606.3) 1992.13,3606.3 2031.5,3566.93 2039.37,3566.93 2062.99,3543.31 2110.24,3543.31 v1(2141.73,3574.8) ; v1(2181.1,3740.16) 2188.98,3732.28 R22.2@2212.6,3732.28 ; v1(2559.06,3992.13) 2559.06,3937.01 v1(2700.79,3795.28)
  Bottom Layer w15.75: v1(1637.8,3795.28) 1779.53,3653.54 1779.53,3629.92 v1(1803.15,3606.3) ; v1(1771.65,3992.13) 1905.51,3992.13 2000,4086.61 2330.71,4086.61 2425.2,3992.13 v1(2559.06,3992.13) ; v1(2141.73,3574.8) 2196.85,3629.92 2196.85,3724.41 v1(2181.1,3740.16) ; HL16.2@2519.68,3677.17 2582.68,3677.17 v1(2700.79,3795.28)
NetHL17_1: HL17.1 HL18.1 HL19.1 HL20.1 VT5.3 | length 6864.7
  Top Layer w23.62: HL17.1@1338.58,2039.37 1370.08,2070.87 1464.57,2070.87 v1(1496.06,2102.36) ; v1(1393.7,3102.36) 1724.41,2771.65 1763.78,2771.65 v1(1834.65,2700.79) ; v1(1748.03,2236.22) 1755.91,2228.35 1779.53,2228.35 1787.4,2220.47 1803.15,2220.47 1811.02,2212.6 1913.39,2212.6 1921.26,2204.72 2031.5,2204.72 2039.37,2196.85 2070.87,2196.85 2078.74,2188.98 2118.11,2188.98 2125.98,2181.1 2165.35,2181.1 2173.23,2173.23 v1(2204.72,2173.23) ; v1(1976.38,2559.06) HL18.1@2086.61,2448.82 ; v1(2251.97,1748.03) v1(2417.32,1748.03) ; v1(2724.41,1472.44) 2755.91,1503.94 2755.91,1559.06 v1(2771.65,1574.8) ; VT5.3@2889.76,976.38 2889.76,952.76 2905.51,937.01 2944.88,937.01 2952.76,929.13 3110.24,929.13 3118.11,937.01 3118.11,1031.5 2992.13,1157.48 2960.63,1157.48 v1(2905.51,1212.6)
  Bottom Layer w23.62: HL20.1@1236.22,3653.54 1267.72,3622.05 1322.83,3622.05 1448.82,3496.06 1448.82,3425.2 1440.94,3417.32 1440.94,3385.83 1433.07,3377.95 1433.07,3338.58 1425.2,3330.71 1425.2,3291.34 1417.32,3283.46 1417.32,3244.09 1409.45,3236.22 1409.45,3196.85 1401.57,3188.98 1401.57,3149.61 1393.7,3141.73 v1(1393.7,3102.36) ; v1(1496.06,2102.36) 1622.05,2228.35 1740.16,2228.35 v1(1748.03,2236.22) ; v1(1834.65,2700.79) v1(1976.38,2559.06) ; HL18.1@2118.11,2393.7 2118.11,2370.08 2196.85,2291.34 2196.85,1803.15 v1(2251.97,1748.03) ; v1(2417.32,1748.03) 2527.56,1637.8 2527.56,1590.55 v1(2905.51,1212.6) ; 2692.91,1440.94 v1(2724.41,1472.44) ; HL19.1@2708.66,3220.47 2708.66,2677.17 2598.43,2566.93 2598.43,2417.32 2551.18,2370.08 2551.18,2204.72 2645.67,2110.24 2645.67,2078.74 2653.54,2070.87 2653.54,2031.5 2661.42,2023.62 2661.42,1913.39 2708.66,1866.14 2708.66,1811.02 2787.4,1732.28 2787.4,1637.8 2779.53,1629.92 2779.53,1606.3 2771.65,1598.43 v1(2771.65,1574.8)
NetHL17_2: HL17.2 R23.2 | length 112.1
  Top Layer w15.75: HL17.2@1440.94,2007.87 1519.68,2007.87 R23.2@1543.31,2031.5
NetHL18_2: HL18.2 R24.2 | length 328.3
  Top Layer w15.75: HL18.2@2244.09,2417.32 2251.97,2417.32 2330.71,2338.58 2354.33,2338.58 v1(2362.2,2330.71) ; R24.2@2385.83,2448.82 2393.7,2440.94 2401.57,2440.94 2409.45,2433.07 v1(2425.2,2433.07)
  Bottom Layer w15.75: v1(2362.2,2330.71) 2362.2,2346.46 2370.08,2354.33 2370.08,2377.95 v1(2425.2,2433.07)
NetHL19_2: HL19.2 R25.2 | length 246.6
  Top Layer w15.75: R25.2@2566.93,3275.59 2614.17,3275.59 2622.05,3283.46 2637.8,3283.46 2661.42,3307.09 2755.91,3307.09 HL19.2@2787.4,3275.59
NetHL20_2: HL20.2 R26.2 | length 123.3
  Top Layer w15.75: HL20.2@1338.58,3677.17 1409.45,3677.17 1425.2,3692.91 1433.07,3692.91 R26.2@1448.82,3708.66
NetHL21_1: HL21.1 HL22.1 HL23.1 HL24.1 VT6.3 | length 7670.9
  Top Layer w23.62: HL22.1@1141.73,2866.14 1173.23,2897.64 1244.09,2897.64 1251.97,2889.76 1291.34,2889.76 1322.83,2921.26 1409.45,2921.26 1496.06,2834.65 1590.55,2834.65 1692.91,2732.28 1700.79,2732.28 v1(1850.39,2582.68) ; v1(1913.39,2078.74) 1937.01,2102.36 v1(2031.5,2102.36) ; v1(2118.11,1748.03) 2173.23,1748.03 2220.47,1700.79 2283.46,1700.79 2291.34,1708.66 2377.95,1708.66 2385.83,1700.79 2480.32,1700.79 2488.19,1708.66 v1(2527.56,1708.66) ; v1(2574.8,1472.44) 2574.8,1503.94 v1(2629.92,1559.06) ; v1(2614.17,3070.87) 2669.29,3015.75 2669.29,2779.53 v1(2811.02,2637.8) ; v1(2637.8,1385.83) 2685.04,1385.83 2732.28,1338.58 ; HL23.1@2669.29,4086.61 2669.29,3905.51 2748.03,3826.77 2748.03,3803.15 v1(2755.91,3795.28) ; VT6.3@2858.27,1259.84 2748.03,1259.84 2740.16,1267.72 2740.16,1330.71 v1(2921.26,1511.81) ; v1(2921.26,2212.6) 3078.74,2055.12 3078.74,2047.24 3086.61,2039.37 3086.61,1976.38 3078.74,1968.5 3078.74,1960.63 3070.87,1952.76 3062.99,1952.76 3055.12,1944.88 2984.25,1944.88 HL21.1@2952.76,1976.38
  Bottom Layer w23.62: v1(1850.39,2582.68) 1850.39,2527.56 1866.14,2511.81 1866.14,2433.07 1881.89,2417.32 1881.89,2338.58 1889.76,2330.71 1889.76,2291.34 1905.51,2275.59 1905.51,2228.35 v1(2031.5,2102.36) ; v1(1913.39,2078.74) 1905.51,2070.87 1905.51,1960.63 v1(2118.11,1748.03) ; HL24.1@2118.11,5047.24 2118.11,4661.42 2291.34,4488.19 2291.34,4385.83 2283.46,4377.95 2283.46,4330.71 2354.33,4259.84 2362.2,4259.84 2370.08,4251.97 2385.83,4251.97 2393.7,4244.09 2535.43,4244.09 HL23.1@2637.8,4141.73 ; v1(2527.56,1708.66) 2566.93,1669.29 2566.93,1622.05 v1(2629.92,1559.06) ; v1(2574.8,1472.44) 2574.8,1448.82 v1(2637.8,1385.83) ; v1(2614.17,3070.87) 2614.17,3110.24 2606.3,3118.11 2606.3,3330.71 2669.29,3393.7 2669.29,3480.32 2716.54,3527.56 2716.54,3566.93 2724.41,3574.8 2724.41,3606.3 2732.28,3614.17 2732.28,3653.54 2740.16,3661.42 2740.16,3700.79 2748.03,3708.66 2748.03,3748.03 2755.91,3755.91 v1(2755.91,3795.28) ; v1(2811.02,2637.8) 2811.02,2598.43 2944.88,2464.57 2944.88,2354.33 2937.01,2346.46 2937.01,2307.09 2929.13,2299.21 2929.13,2259.84 2921.26,2251.97 v1(2921.26,2212.6) ; v1(2921.26,1511.81) HL21.1@2921.26,1976.38
NetHL21_2: HL21.2 R27.2 | length 246.6
  Top Layer w15.75: R27.2@2787.4,2047.24 2803.15,2047.24 2811.02,2055.12 2826.77,2055.12 2834.65,2062.99 2850.39,2062.99 2858.27,2070.87 2968.5,2070.87 HL21.2@3007.87,2031.5
NetHL22_2: HL22.2 R28.2 | length 112.1
  Top Layer w15.75: HL22.2@1244.09,2834.65 1322.83,2834.65 R28.2@1346.46,2858.27
NetHL23_2: HL23.2 R29.2 | length 246.6
  Top Layer w15.75: R29.2@2527.56,4141.73 2574.8,4141.73 2582.68,4149.61 2598.43,4149.61 2622.05,4173.23 2716.54,4173.23 HL23.2@2748.03,4141.73
NetHL24_2: HL24.2 R30.2 | length 283.5
  Top Layer w15.75: R30.2@2212.6,4763.78 HL24.2@2212.6,5047.24
NetR1_2: R1.2 VT1.1 | length 316.1
  Top Layer w15.75: VT1.1@1118.11,212.6 1220.47,212.6 1236.22,196.85 1236.22,157.48 1267.72,125.98 1330.71,125.98 R1.2@1362.2,157.48
NetR2_2: R2.2 VT2.1 | length 263.7
  Top Layer w15.75: VT2.1@1118.11,488.19 1251.97,488.19 1267.72,503.94 1330.71,503.94 R2.2@1362.2,472.44
NetR3_2: R3.2 VT3.1 | length 263.7
  Top Layer w15.75: VT3.1@1118.11,763.78 1251.97,763.78 1267.72,779.53 1330.71,779.53 R3.2@1362.2,748.03
NetR4_2: R4.2 VT4.1 | length 271.5
  Top Layer w15.75: VT4.1@2811.02,748.03 2905.51,748.03 2913.39,755.91 2952.76,755.91 2960.63,763.78 3023.62,763.78 3039.37,748.03 3039.37,740.16 R4.2@3055.12,724.41
NetR5_2: R5.2 VT5.1 | length 271.5
  Top Layer w15.75: VT5.1@2811.02,1023.62 2905.51,1023.62 2913.39,1031.5 2952.76,1031.5 2960.63,1039.37 3023.62,1039.37 3039.37,1023.62 3039.37,1015.75 R5.2@3055.12,1000
NetR6_2: R6.2 VT6.1 | length 271.5
  Top Layer w15.75: VT6.1@2811.02,1299.21 2944.88,1299.21 2960.63,1314.96 3023.62,1314.96 3039.37,1299.21 3039.37,1291.34 R6.2@3055.12,1275.59
PWM1: A1.6 R1.1 | length 1931.2
  Top Layer w15.75: R1.1@1314.96,196.85 1346.46,228.35 1409.45,228.35 1456.69,181.1 1771.65,181.1 1826.77,125.98 1834.65,125.98 1842.52,118.11 1889.76,118.11 1897.64,125.98 1913.39,125.98 1921.26,133.86 1944.88,133.86 1952.76,141.73 1976.38,141.73 1984.25,149.61 2007.87,149.61 2015.75,157.48 2039.37,157.48 2047.24,165.35 v1(2070.87,165.35)
  Bottom Layer w15.75: v1(2070.87,165.35) 2149.61,165.35 2173.23,188.98 2173.23,795.28 A1.6@2440.94,1062.99
PWM2: A1.8 R2.1 | length 1851.5
  Top Layer w15.75: R2.1@1314.96,433.07 1346.46,401.57 1440.94,401.57 1448.82,409.45 1488.19,409.45 1496.06,417.32 v1(1535.43,417.32)
  Bottom Layer w15.75: v1(1535.43,417.32) 1826.77,125.98 1834.65,125.98 1842.52,118.11 2094.49,118.11 2110.24,133.86 2173.23,133.86 2204.72,165.35 2204.72,629.92 A1.8@2440.94,866.14
PWM3: A1.9 R3.1 | length 2004.7
  Top Layer w15.75: v1(1299.21,677.17) R3.1@1299.21,708.66
  Bottom Layer w15.75: v1(1299.21,677.17) 1299.21,582.68 1511.81,370.08 1527.56,370.08 1803.15,94.49 1811.02,94.49 1826.77,78.74 2110.24,78.74 2133.86,102.36 2196.85,102.36 2236.22,141.73 2236.22,559.06 A1.9@2440.94,763.78
PWM4: A1.12 R4.1 | length 571.6
  Top Layer w15.75: v1(2937.01,708.66) R4.1@2976.38,708.66
  Bottom Layer w15.75: A1.12@2496.06,488.19 2716.54,708.66 v1(2937.01,708.66)
PWM5: A1.13 R5.1 | length 808
  Top Layer w15.75: A1.13@2480.32,409.45 2677.17,606.3 2677.17,629.92 2692.91,645.67 v1(2692.91,748.03) ; v1(2937.01,984.25) R5.1@2976.38,984.25
  Bottom Layer w15.75: v1(2692.91,748.03) 2929.13,984.25 v1(2937.01,984.25)
PWM6: A1.14 R6.1 | length 1222.8
  Top Layer w15.75: v1(2992.13,1204.72) R6.1@2992.13,1244.09
  Bottom Layer w15.75: A1.14@2480.32,307.09 2834.65,661.42 2960.63,661.42 2992.13,692.91 v1(2992.13,1204.72)
VBAT_OUT: A2.1 SA1.2 | length 2221.5
  Top Layer w23.62: v1(1614.17,220.47) 1677.17,283.46 v1(1677.17,338.58) ; v1(1692.91,141.73) 1748.03,141.73 1795.28,94.49 1803.15,94.49 1818.9,78.74 1913.39,78.74 1929.13,94.49 1944.88,94.49 1952.76,102.36 1976.38,102.36 1984.25,110.24 2055.12,110.24 2062.99,102.36 2244.09,102.36 2283.46,141.73 2409.45,141.73 2433.07,118.11 2496.06,118.11 2503.94,125.98 2559.06,125.98 2566.93,118.11 2606.3,118.11 2614.17,110.24 2653.54,110.24 2661.42,102.36 2700.79,102.36 2708.66,94.49 2748.03,94.49 2755.91,86.61 2795.28,86.61 2803.15,78.74 2913.39,78.74 SA1.2@2952.76,118.11
  Bottom Layer w23.62: v1(1614.17,220.47) v1(1692.91,141.73) ; v1(1677.17,338.58) A2.1@1677.17,937.01
VBAT_S: A1.26 C2.1 R32.2 R33.1 | length 804.9
  Top Layer w15.75: v1(2078.74,716.54) R33.1@2110.24,685.04 ; v1@2086.61,732.28 2125.98,771.65 C2.1@2125.98,803.15 ; R33.1@2141.73,645.67 2173.23,614.17 2173.23,574.8 2204.72,543.31 R32.2@2204.72,527.56
  Bottom Layer w15.75: A1.26@1881.89,1157.48 2086.61,952.76 2086.61,724.41 v1(2078.74,716.54)
VBAT_SW: A3.1 R32.1 SA1.1 | length 3224.8
  Top Layer w23.62: v1(2039.37,937.01) 2118.11,1015.75 v1(2118.11,1102.36) ; v1(2078.74,590.55) 2125.98,543.31 R32.1@2125.98,527.56 ; v1(2118.11,1354.33) 2409.45,1645.67 2519.68,1645.67 2559.06,1606.3 v1(2669.29,1606.3)
  Bottom Layer w23.62: v1(2039.37,937.01) 2047.24,929.13 2047.24,763.78 2031.5,748.03 2031.5,685.04 2078.74,637.8 v1(2078.74,590.55) ; v1(2118.11,1102.36) 2125.98,1110.24 2125.98,1346.46 v1(2118.11,1354.33) ; v1(2669.29,1606.3) 3039.37,1236.22 3039.37,661.42 3047.24,653.54 3047.24,622.05 A3.1@3196.85,472.44 ; SA1.1@3078.74,173.23 3078.74,275.59 A3.1@3196.85,393.7
pads on no net: A1.1 A1.2 A1.3 A1.7 A1.10 A1.11 A1.15 A1.16 A1.17 A1.18 A1.21 A1.22 A1.23 A1.24 A1.25 A1.28 A1.30 SA1.3

## Other copper
Bottom Layer:
  text "CHRISTMAS TREE" at 2696.68,3858.27 h78.74

## Silkscreen, mask and mechanical layers (free items; w line width, h text height)
Bottom Overlay:
  text "SydorenkoG12  YALYNKA v1.0  2026" at 3209.66,2992.13 h59.06
Mechanical 1:
  the board outline again, w3.94